# Altium PCB 20通道传感器-蓝牙主机.PcbDoc (part 2 of 2)
Units mil, origin at the board's own origin, x right, y up, seen from the top; angles counter-clockwise.
Board outline 5314.97 x 3394.43 mil, 2 copper layers (Top Layer, Bottom Layer); 93 components, 99 nets, 352 pads, 927 vias.
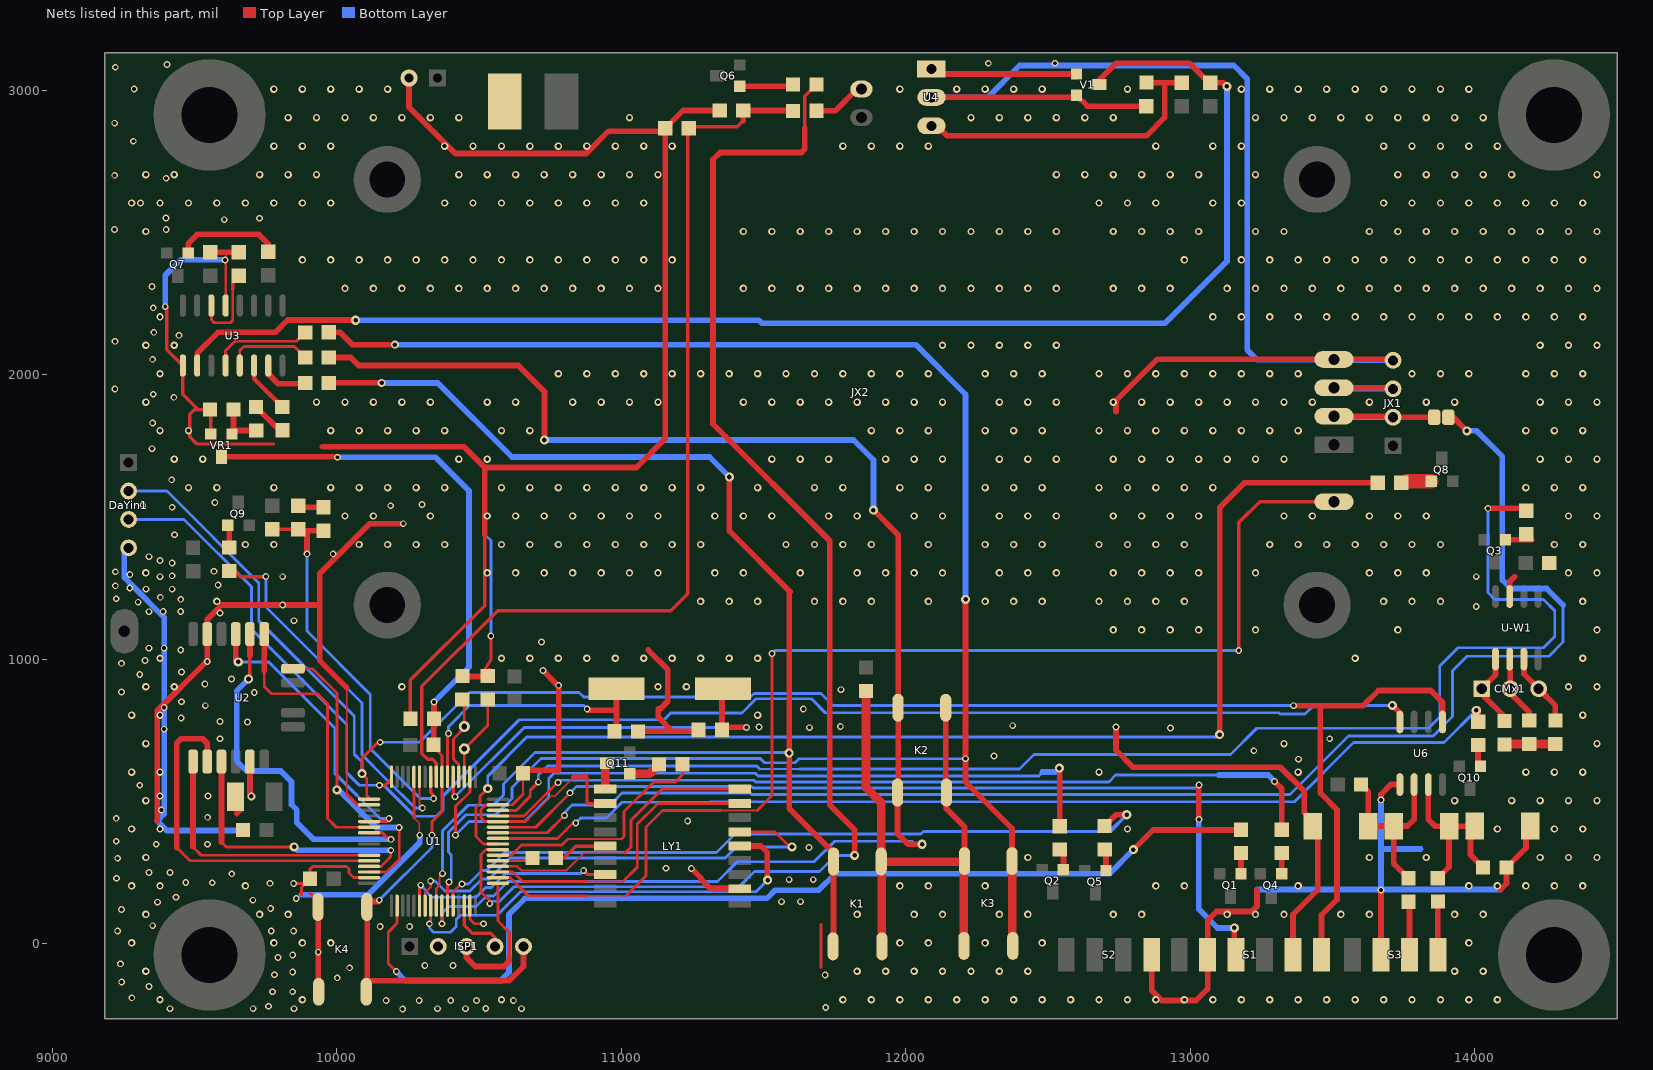
[diagram p2: the nets of this part, all layers, seen from the top]

## Via types
v1: diameter 26, hole 13.78, Top Layer to Bottom Layer, 644 vias
v2: diameter 23.62, hole 13.78, Top Layer to Bottom Layer, 242 vias
v3: diameter 32, hole 16, Top Layer to Bottom Layer, 34 vias
v4: diameter 28, hole 16, Top Layer to Bottom Layer, 7 vias

## Nets (pads, with @x,y where several pads share a name; then routed paths per layer and width w, separated by ;. In a path a pad name is that pad's centre, name@x,y a point inside that pad or via, vN(x,y) a via of type N, cw(c..) or ccw(c..) an arc to the next point about the centre after c; other vN are vias at no path point) (continued)
GND: C1.1 C2.1 C3.2 C4.1 C6.1 C7.1 C8.1 C9.1 C10.1 C11.1 C12.1 C13.2 C14.2 C15.2 CE3.2 Cm1.1 CON1.2 D2.2 D4.2 DaYin1.4 ISP1.2 JX1.4 JX2.4 K4.3 K4.4 LY1.2 LY1.11 R22.1 R23.2 R24.2 S1.2 S1.5 S2.4 S3.2 U1.12 U1.18 U1.31 U1.47 U1.60 U1.63 U2.5 U2.15 U3.1 U3.13 U4.2 U6.5 U-W1.7 V1.2 VR1.2 XZ1.2 | length 23882.8
  Top Layer w6: v2(9607.15,2402.27) v2@9609.42,2400 ; v2@9611.15,2402.23 9611.45,2429.97 ; 9648.91,447.76 9648.91,457.76 ; 10034.74,900.03 10035.44,899.33 10035.44,524.34 ; U1.12@10271.2,586.5 10271.2,549.87 U1.12@10271.99,549.87 ; 10271.99,441.84 10289.7,424.13 10289.7,383.43 v2(10291.87,381.26) ; 10654.44,525.25 C1.1@10654.44,609.5 ; 10673.15,441.14 10673.15,438.41 10752.93,518.19 10766.71,518.19 10832.83,584.32
  Top Layer w9: U3.13@9609.42,2242.77 v2@9609.42,2400
  Top Layer w10: 9508.48,1755.9 9778.48,1755.9 ; v2(9848.54,211.24) 9882.58,211.24 C2.1@9906.53,235.19 ; 9876.31,171.87 9876.31,197.67 C2.1@9906.53,227.88 C2.1@9906.53,235.19 ; 9905.28,177.88 9934.15,149.01 K4.3@9934.15,129 ; 9935.85,10.07 9935.85,71.64 ; U1.31@10113.73,232.18 10058.57,232.18 10043.04,247.72 10043.04,263.51 10034.84,271.7 9915.49,271.7 9906.98,263.19 9906.53,263.19 C2.1@9906.53,235.19 ; 10271.99,441.84 U1.12@10271.99,549.87 ; U1.47@10468.05,133.76 10468.05,85.85 10483.9,70 v2(10516.05,70) ; 10504.33,939.18 10512.88,952.42 10541.7,997.06 v2(10541.7,1081.59) ; 10654.44,525.25 10617.28,488.08 10523.61,488.08 10507.42,471.89 10507.42,442.31 10520.7,429.03 10663.76,429.03 10673.15,438.41 ; 10880,588.63 10880,494.84 10881.94,492.9 LY1.11@10943.93,492.9
  Top Layer w12: v2(9397.44,2238.8) 9403.24,2233 9403.24,2087.95 U3.1@9459.42,2031.77 9459.42,1931.12 9513.63,1876.91 ; 9508.48,1755.9 9482.87,1781.51 9482.87,1860.01 9499.77,1876.91 9513.63,1876.91 ; VR1.2@9556.96,1791.24 9556.96,1874.67 C13.2@9554.72,1876.91 9513.63,1876.91 ; 10035.44,524.34 10071.7,488.08 U1.18@10113.73,488.08 ; C12.1@10258.99,790.1 10258.98,926.53 10519.91,1187.45 10519.91,1438.03 ; 11701.84,-83.94 11701.84,66.06
  Top Layer w20: 9369.29,431.19 9369.29,818.44 v2@9539.01,988.16 ; v2@9547.54,991.53 v2(9545,991.53) U2.15@9545,1087.82 9545,1139.63 9595.37,1190 v2(9810,1190) 9940,1190 ; C3.2@9555.63,2429.97 9601.73,2429.97 ; 9611.45,2429.97 C6.1@9655.63,2429.97 ; 9648.91,457.76 CE3.2@9660.49,469.34 ; U2.5@9695,639.98 9695,525.11 9700.18,519.93 v4(9700.18,517.77) ; R22.1@9864.47,1539.02 9869.79,1533.7 C14.2@9953.43,1533.7 ; K4.3@9935.15,153.33 v2(9935.15,-30) 9935.15,-142.27 K4.4@9937.55,-144.67 ; 9950,1746.24 10447,1746.24 10519.91,1673.34 ; 10034.74,900.03 9940,994.77 9940,1190 ; v2(10234,1476) 10116,1476 9940,1300 9940,1190 ; XZ1.2@10254.08,3042.23 10254.08,2939.58 10416.66,2776.99 10876.99,2776.99 10955.61,2855.61 11144.85,2855.61 11217.34,2928.1 C15.2@11346.3,2928.1 ; C10.1@10444,939.18 10504.33,939.18 10528.37,939.18 C11.1@10530.81,940.84 10540.69,947.58 C11.1@10536.18,957.94 ; 10519.91,1438.03 10519.91,1673.34 ; C1.1@10654.44,609.5 10780,609.5 v2@10780,904.76 ; v2(10724.76,960) 10776.39,908.37 10779.31,908.37 v2(10780,907.68) ; 10832.83,584.32 10875.68,584.32 ; C7.1@11059,745.97 11180,745.97 ; 11094.34,1032.34 11163.31,963.37 11163.31,851.6 11137.34,825.62 11130,825.62 11130,795.97 11180,745.97 ; R23.2@11154.85,2855.61 11154.85,1774.85 11053.34,1673.34 10519.91,1673.34 ; v2(11246.34,264.39) 11280.52,230.22 11280.52,226.38 11314,192.9 LY1.2@11416.37,192.9 LY1.2@11416.53,192.9 ; C8.1@11271,752 11264.97,745.97 11180,745.97 ; U4.2@12090,2974.11 12592.79,2974.11 V1.2@12600,2981.32 12638,2943.32 C9.1@12845.29,2943.32 ; v2(12738.45,761.54) 12738.45,680 12798.45,620 13315.9,620 13400,535.9 13400,460.79 13447.39,413.4 13447.39,188.9 13360.75,102.26 S1.5@13360.75,-38.5 ; 12739,1870 12739,1909 12883.34,2053.34 JX2.4@13504.55,2053.34 13708.94,2053.34 JX1.4@13712.34,2049.93 ; S2.4@12864.11,-38.5 12864.11,-164.11 12900,-200 13020,-200 13060.75,-159.25 S1.2@13060.75,-38.5 13060.75,81.9 13091.75,112.9 13215.56,112.9 13234,131.34 13234,188.9 ; S3.2@13669.83,-38.5 v2(13669.83,188.9) ; v2(13669.83,505.26) 13669.83,524.68 13704.22,559.06 U6.5@13736.31,559.06 ; 14087.8,190 14090,190 14111.15,211.15 R24.2@14111.15,267.98 14179.3,336.12 D2.2@14179.3,411.4 ; U-W1.7@14122.24,1220 14122.24,1272.24 14139.89,1289.89
  Bottom Layer w10: 10519.91,1438.03 10541.7,1416.23 v2(10541.7,1081.59) ; U4.2@12069.53,2974.11 U4.2@12090,2974.11 ; 13447.39,188.9 v2(13669.83,188.9)
  Bottom Layer w20: DaYin1.4@9253.56,1384.98 9253.56,1286.44 9281.24,1258.76 9393.42,1146.58 v2(9393.42,1038.33) v2(9393.42,830) v2(9393.42,753.84) 9393.42,518.8 9393.42,455.32 9369.29,431.19 9402.87,397.62 9654.39,397.62 ; v2(9397.44,2238.8) 9397.44,2348.96 9452.41,2403.93 9605.49,2403.93 v2(9607.15,2402.27) ; 9876.31,171.87 10109.37,171.87 10291.87,354.37 v2(10291.87,381.26) ; U4.2@12090,2974.11 12288.21,2974.11 12400,3085.9 13153.01,3085.9 13200,3038.91 13200,2802.9 13200,2086.42 13234,2052.42 13503.64,2052.42 JX2.4@13504.55,2053.34 13507.96,2049.93 JX1.4@13712.34,2049.93 ; 13234,188.9 13235.1,190 v2@13670,190 ; v2(13669.83,505.26) 13670,505.09 13670,332.87 ; 13810,332.87 13670,332.87 ; 14087.8,190 v2@13670,190 ; v2@13670,190 13670,332.87
  other v1: 9379,-197.1 9879,-197.1 10579,-197.1 11779,-197.1 11879,-197.1 11979,-197.1 12079,-197.1 12179,-197.1 12279,-197.1 12379,-197.1 12479,-197.1 12579,-197.1 12679,-197.1 12779,-197.1 12879,-197.1 12979,-197.1 13079,-197.1 13179,-197.1 13279,-197.1 13379,-197.1 13479,-197.1 13579,-197.1 13679,-197.1 13779,-197.1 13879,-197.1 13979,-197.1 14079,-197.1 9329,-97.1 11829,-97.1 11929,-97.1 12029,-97.1 12129,-97.1 12229,-97.1 12329,-97.1 12429,-97.1 13929,-97.1 14029,-97.1 9279,2.9 9779,2.9 9879,2.9 9979,2.9 11979,2.9 12079,2.9 12279,2.9 12479,2.9 13979,2.9 9329,102.9 9729,102.9 9829,102.9 11829,102.9 12029,102.9 12129,102.9 12329,102.9 12429,102.9 12729,102.9 12829,102.9 13129,102.9 13229,102.9 13329,102.9 13529,102.9 13629,102.9 13929,102.9 14029,102.9 9279,202.9 9379,202.9 9679,202.9 11979,202.9 12079,202.9 12279,202.9 12879,202.9 12979,202.9 13379,202.9 13979,202.9 14079,202.9 14179,202.9 14279,202.9 14379,202.9 9329,302.9 12429,302.9 13629,302.9 13829,302.9 14229,302.9 14329,302.9 14429,302.9 9279,402.9 9379,402.9 12779,402.9 14079,402.9 14279,402.9 14379,402.9 9329,502.9 13929,502.9 14129,502.9 14229,502.9 14329,502.9 14429,502.9 9279,602.9 9379,602.9 12679,602.9 13379,602.9 14179,602.9 14279,602.9 14379,602.9 9329,702.9 13329,702.9 14429,702.9 9279,802.9 9379,802.9 11479,802.9 14379,802.9 9329,902.9 9429,902.9 10229,902.9 11129,902.9 11229,902.9 14329,902.9 14429,902.9 9379,1002.9 10579,1002.9 10679,1002.9 10779,1002.9 10879,1002.9 10979,1002.9 11079,1002.9 11179,1002.9 11279,1002.9 11379,1002.9 11479,1002.9 13579,1002.9 14379,1002.9 12729,1102.9 12829,1102.9 12929,1102.9 13029,1102.9 13229,1102.9 13729,1102.9 14429,1102.9 9579,1202.9 11279,1202.9 11379,1202.9 11479,1202.9 11679,1202.9 11779,1202.9 11879,1202.9 12079,1202.9 12279,1202.9 12379,1202.9 12479,1202.9 12679,1202.9 12779,1202.9 12879,1202.9 12979,1202.9 13679,1202.9 13779,1202.9 13879,1202.9 14379,1202.9 9329,1302.9 10529,1302.9 10629,1302.9 10729,1302.9 10829,1302.9 10929,1302.9 11029,1302.9 11129,1302.9 11329,1302.9 11429,1302.9 11629,1302.9 11829,1302.9 11929,1302.9 12029,1302.9 12129,1302.9 12329,1302.9 12429,1302.9 12529,1302.9 12729,1302.9 12829,1302.9 12929,1302.9 13029,1302.9 13229,1302.9 13629,1302.9 13729,1302.9 13829,1302.9 14329,1302.9 14429,1302.9 9679,1402.9 9779,1402.9 10079,1402.9 10179,1402.9 10279,1402.9 10379,1402.9 10579,1402.9 10679,1402.9 10779,1402.9 10879,1402.9 10979,1402.9 11079,1402.9 11179,1402.9 11279,1402.9 11579,1402.9 11679,1402.9 11779,1402.9 11879,1402.9 12079,1402.9 12279,1402.9 12379,1402.9 12479,1402.9 12679,1402.9 12779,1402.9 12879,1402.9 12979,1402.9 13279,1402.9 13379,1402.9 13479,1402.9 13579,1402.9 13679,1402.9 13779,1402.9 13879,1402.9 14279,1402.9 14379,1402.9 10029,1502.9 10129,1502.9 10329,1502.9 10529,1502.9 10629,1502.9 10729,1502.9 10829,1502.9 10929,1502.9 11029,1502.9 11129,1502.9 11329,1502.9 11429,1502.9 11529,1502.9 11729,1502.9 11829,1502.9 12029,1502.9 12129,1502.9 12329,1502.9 12429,1502.9 12529,1502.9 12729,1502.9 12829,1502.9 12929,1502.9 13029,1502.9 13329,1502.9 13429,1502.9 13629,1502.9 13729,1502.9 13829,1502.9 14329,1502.9 14429,1502.9 9479,1602.9 9579,1602.9 9779,1602.9 9979,1602.9 10079,1602.9 10179,1602.9 10279,1602.9 10379,1602.9 10579,1602.9 10679,1602.9 10779,1602.9 10879,1602.9 10979,1602.9 11079,1602.9 11179,1602.9 11279,1602.9 11479,1602.9 11679,1602.9 11779,1602.9 11979,1602.9 12079,1602.9 12279,1602.9 12379,1602.9 12479,1602.9 12679,1602.9 12779,1602.9 12879,1602.9 12979,1602.9 13079,1602.9 14179,1602.9 14279,1602.9 14379,1602.9 9429,1702.9 9529,1702.9 10429,1702.9 10529,1702.9 11529,1702.9 11629,1702.9 11729,1702.9 11929,1702.9 12029,1702.9 12129,1702.9 12329,1702.9 12429,1702.9 12529,1702.9 12729,1702.9 12829,1702.9 12929,1702.9 13029,1702.9 13129,1702.9 13229,1702.9 13329,1702.9 14229,1702.9 14329,1702.9 14429,1702.9 9379,1802.9 9479,1802.9 9979,1802.9 10079,1802.9 10179,1802.9 10279,1802.9 10379,1802.9 10579,1802.9 10679,1802.9 11879,1802.9 11979,1802.9 12079,1802.9 12279,1802.9 12379,1802.9 12479,1802.9 12679,1802.9 12779,1802.9 12879,1802.9 12979,1802.9 13079,1802.9 13179,1802.9 13279,1802.9 13379,1802.9 14179,1802.9 14279,1802.9 14379,1802.9 9329,1902.9 9929,1902.9 10029,1902.9 10129,1902.9 10229,1902.9 10329,1902.9 10529,1902.9 10629,1902.9 10829,1902.9 10929,1902.9 11029,1902.9 11129,1902.9 11429,1902.9 11529,1902.9 11629,1902.9 11729,1902.9 11829,1902.9 11929,1902.9 12029,1902.9 12129,1902.9 12329,1902.9 12429,1902.9 12529,1902.9 12729,1902.9 12829,1902.9 12929,1902.9 13029,1902.9 13129,1902.9 13229,1902.9 13329,1902.9 13429,1902.9 13629,1902.9 13829,1902.9 13929,1902.9 14229,1902.9 14329,1902.9 14429,1902.9 9379,2002.9 10779,2002.9 10879,2002.9 10979,2002.9 11079,2002.9 11179,2002.9 11279,2002.9 11379,2002.9 11479,2002.9 11579,2002.9 11679,2002.9 11779,2002.9 11879,2002.9 11979,2002.9 12079,2002.9 12279,2002.9 12379,2002.9 12479,2002.9 12679,2002.9 12779,2002.9 12879,2002.9 12979,2002.9 13079,2002.9 13179,2002.9 13279,2002.9 13379,2002.9 13779,2002.9 13879,2002.9 13979,2002.9 14179,2002.9 14279,2002.9 14379,2002.9 9329,2102.9 9429,2102.9 12129,2102.9 12229,2102.9 12329,2102.9 12429,2102.9 12529,2102.9 14229,2102.9 14329,2102.9 14429,2102.9 9379,2202.9 13079,2202.9 13179,2202.9 13279,2202.9 13379,2202.9 13479,2202.9 13579,2202.9 13679,2202.9 13779,2202.9 13879,2202.9 13979,2202.9 14079,2202.9 14179,2202.9 14279,2202.9 14379,2202.9 10029,2302.9 10129,2302.9 10229,2302.9 10329,2302.9 10429,2302.9 10529,2302.9 10629,2302.9 10729,2302.9 10829,2302.9 10929,2302.9 11029,2302.9 11129,2302.9 11429,2302.9 11529,2302.9 11629,2302.9 11729,2302.9 11829,2302.9 11929,2302.9 12029,2302.9 12129,2302.9 12229,2302.9 12329,2302.9 12429,2302.9 12529,2302.9 12729,2302.9 12829,2302.9 12929,2302.9 13129,2302.9 13229,2302.9 13329,2302.9 13429,2302.9 13529,2302.9 13629,2302.9 13729,2302.9 13829,2302.9 13929,2302.9 14029,2302.9 14129,2302.9 14229,2302.9 14329,2302.9 14429,2302.9 9879,2402.9 9979,2402.9 10079,2402.9 10179,2402.9 10279,2402.9 10379,2402.9 10479,2402.9 10579,2402.9 10679,2402.9 10779,2402.9 10879,2402.9 10979,2402.9 11079,2402.9 11179,2402.9 12979,2402.9 13179,2402.9 13279,2402.9 13379,2402.9 13479,2402.9 13579,2402.9 13679,2402.9 13779,2402.9 13879,2402.9 13979,2402.9 14079,2402.9 14179,2402.9 14279,2402.9 14379,2402.9 9329,2502.9 11429,2502.9 11529,2502.9 11629,2502.9 11729,2502.9 11829,2502.9 11929,2502.9 12029,2502.9 12129,2502.9 12229,2502.9 12329,2502.9 12429,2502.9 12529,2502.9 12729,2502.9 12829,2502.9 12929,2502.9 13029,2502.9 13229,2502.9 13329,2502.9 13629,2502.9 13729,2502.9 13829,2502.9 13929,2502.9 14029,2502.9 14129,2502.9 14229,2502.9 14329,2502.9 14429,2502.9 9279,2602.9 9379,2602.9 9479,2602.9 9579,2602.9 9679,2602.9 9779,2602.9 9879,2602.9 9979,2602.9 10379,2602.9 10479,2602.9 10579,2602.9 10679,2602.9 10779,2602.9 10879,2602.9 10979,2602.9 11079,2602.9 12679,2602.9 12779,2602.9 12879,2602.9 13079,2602.9 13179,2602.9 13679,2602.9 13779,2602.9 13879,2602.9 13979,2602.9 14079,2602.9 14179,2602.9 14279,2602.9 14379,2602.9 9329,2702.9 9429,2702.9 9729,2702.9 9829,2702.9 9929,2702.9 10429,2702.9 10529,2702.9 10629,2702.9 10729,2702.9 10829,2702.9 10929,2702.9 11029,2702.9 11129,2702.9 12529,2702.9 12629,2702.9 12729,2702.9 12829,2702.9 12929,2702.9 13029,2702.9 13229,2702.9 13729,2702.9 13829,2702.9 13929,2702.9 14029,2702.9 14129,2702.9 14429,2702.9 9779,2802.9 9879,2802.9 9979,2802.9 10379,2802.9 10479,2802.9 10579,2802.9 10679,2802.9 10779,2802.9 10879,2802.9 10979,2802.9 11079,2802.9 11179,2802.9 11779,2802.9 11879,2802.9 11979,2802.9 12079,2802.9 12879,2802.9 13079,2802.9 13179,2802.9 13679,2802.9 13779,2802.9 13879,2802.9 13979,2802.9 14079,2802.9 9829,2902.9 9929,2902.9 10029,2902.9 10129,2902.9 10229,2902.9 10329,2902.9 10429,2902.9 11029,2902.9 12229,2902.9 12329,2902.9 12429,2902.9 12529,2902.9 12629,2902.9 12729,2902.9 13229,2902.9 13329,2902.9 13429,2902.9 13529,2902.9 13629,2902.9 13729,2902.9 13829,2902.9 13929,2902.9 14029,2902.9 9779,3002.9 9879,3002.9 9979,3002.9 10079,3002.9 10179,3002.9 11979,3002.9 12179,3002.9 12279,3002.9 12379,3002.9 12479,3002.9 12779,3002.9 13179,3002.9 13279,3002.9 13379,3002.9 13479,3002.9 13579,3002.9 13679,3002.9 13779,3002.9 13879,3002.9 13979,3002.9
  other v2: 10231.83,-230 9414.4,-228.38 9706.19,-228.38 9850,-228.38 10354.51,-228.38 10452.54,-228.38 10523.61,-228.08 10649.32,-228.38 11718.68,-224.13 9760,-220 10173.54,-200.11 10289.61,-200.11 10400.59,-200.11 10490.98,-200.11 10620.64,-200 9280,-190.44 9774.37,-169 9845,-169 9340,-150.58 9244.29,-134.68 10001.88,-120 11716.54,-110 9780.93,-109.17 9845,-100 10045.57,-84.85 10309.69,-77.1 10408.96,-77.1 9240,-71.08 9793.91,-48.89 9845,-40.26 9230,44.68 9770,44.68 9848.54,44.68 10152.56,60 10256.36,60 9352.96,63.2 9243.56,120 9767.66,123.73 9370,145.73 11562.92,147.45 11630,147.45 9705,152.83 9857.65,158.53 9435.1,163.09 9765.63,212.12 9562.47,213.93 9469.51,214.57 11590,224.9 11674.76,224.9 9225.72,229.75 9630.93,245.18 9340,250 9414.4,250 11157.33,264.99 9230,300 11660,338.03 9365.7,349.46 9545.62,349.46 9225.22,360 11233.24,430.91 9225.22,440.28 9546.24,443.9 9383.51,470 9379,518.8 9547.23,518.64 9307.82,556.73 13380,648.2 12310,659.61 13223.1,677.9 9590,720.04 13489.71,720.04 12930,758.06 11661.82,759.18 11484.21,761.54 11770,763.48 12375.57,766.08 9686.63,779.06 9590,780.88 9453.12,792.91 11640,824.9 9538.31,836.45 9454.35,850 9710,882.84 9243.56,884.51 11772,892.61 9536.63,912.68 9630,930 9307.82,945.86 9454.35,954.54 9243.56,984.99 9326.18,994.77 9451.87,1032.34 9340.45,1038.33 10720,1060 9850,1135.26 9590,1161.65 9340,1166.65 9390.08,1166.97 9451.74,1166.97 14004.73,1184.95 9302.2,1200 9451.87,1210 9225.22,1212.25 9380,1217.22 9330,1245.87 9421.64,1245.87 9272.48,1250 9221.81,1257.58 9583.46,1260.05 9379,1289.89 9810,1289.89 14004.73,1289.89 9421.64,1292.62 9272.84,1297 9221.81,1307 9568.48,1308.5 9421.64,1337.55 9379,1346.58 9340,1360.15 9987.5,1370 9430,1436.96 9421.64,1533.7 10189.57,1539.02 9318.6,1540.8 10300,1543.7 9571.52,1550 9419.93,1630 9351.16,1739.62 9352.96,1830 9427.51,1920 9355.13,1930.91 9220.35,1949.42 9352.96,2053.34 9221.03,2116.85 9445.28,2137.89 9357.37,2148.45 9355.13,2234.42 9351.16,2309.5 9218.95,2510 9400.63,2510 9604.67,2544.34 9728.42,2549.3 9400,2550 9310.58,2603.17 9400.63,2690 9219.6,2700 9285.1,2820 9219.65,2883.58 9288.18,3003.3 9221.81,3080 9403.28,3090 12290,3094.11 12524.11,3094.11
K-1: Cm2.2 CMx1.1 U-W1.1 | length 270.6
  Top Layer w20: U-W1.1@14072.24,1000 14072.24,944.01 CMx1.1@14024.15,895.92 14024.15,877.38 14103.68,797.85 Cm2.2@14103.68,782.25
K-2: Cm3.2 CMx1.2 U-W1.2 | length 244.1
  Top Layer w6: U-W1.2@14122.24,1000 14122.24,980 U-W1.2@14124.15,978.09
  Top Layer w12: CMx1.2@14124.15,881.25 CMx1.2@14124.15,895.92
  Top Layer w20: CMx1.2@14124.15,881.25 14190.82,814.58 Cm3.2@14190.82,784.3 ; CMx1.2@14124.15,895.92 U-W1.2@14124.15,978.09
K-3: Cm4.2 CMx1.3 U-W1.3 | length 269
  Top Layer w6: Cm4.2@14285.99,779.97 Cm4.2@14289.18,783.16
  Top Layer w20: U-W1.3@14172.24,1000 14172.24,947.83 CMx1.3@14224.15,895.92 14282.83,837.24 Cm4.2@14282.83,784.02 ; Cm4.2@14293.99,778.35 Cm4.2@14295.89,780.25
KEY1: K1.1 K1.2 R5.2 U1.41 | length 4956.2
  Top Layer w8: U1.41@10349.94,133.76 10349.94,193.98 10361.37,205.41 10361.37,235.08 v2(10372.08,245.8)
  Top Layer w20: R5.2@9971.63,1970.71 10157.38,1970.71 v4(10157.58,1970.51) ; v3(11380,1640) 11380,1450 11593.51,1236.49 11590,1232.98 v3(11590,670) 11590,475.66 11746.15,319.51 K1.1@11746.15,288.59 K1.2@11746.15,11.03
  Bottom Layer w6: v3@11588.19,671.81 v3(11590,670)
  Bottom Layer w10: v2(10372.08,245.8) 10372.08,396.56 10462.08,486.56 10549.94,486.56 10585.7,522.31 10585.7,561 10696.51,671.81 v3@11588.19,671.81
  Bottom Layer w20: v4(10157.58,1970.51) 10355.22,1970.51 10615.72,1710 11310,1710 v3(11380,1640)
KEY2: K2.1 K2.2 R3.2 U1.42 | length 5512.4
  Top Layer w6: U1.42@10369.63,133.76 U1.42@10370,133.38
  Top Layer w10: v2(10370,70) U1.42@10370,133.38
  Top Layer w20: R3.2@9971.98,2060.2 10049.11,2060.2 10077.54,2031.77 10213.41,2031.77 10637.87,2031.77 10730,1939.64 v3(10730,1770) ; v3(11886.15,1523.85) 11973.01,1436.99 K2.1@11973.01,829 11973.01,533 K2.2@11971.01,531 11971.01,386.3 12007.93,349.37 v3(12057.19,349.37)
  Bottom Layer w10: v2(10370,70) 10370,106.37 10369.63,106.74 10392.98,130.09 10489.53,130.09 10526.6,167.17 10550.77,167.17 10601.75,218.15 11338.15,218.15 11407.78,287.78 11677.78,287.78 11750,360 12021.19,360 12031.81,349.37 v3(12057.19,349.37)
  Bottom Layer w20: v3(10730,1770) 11816.15,1770 11886.15,1700 v3(11886.15,1523.85)
KEY3: K3.3 K3.4 R2.2 U1.43 | length 6561.8
  Top Layer w6: v2@10389.31,211.51 v2@10394.09,216.29 ; K3.3@12373.49,-5.42 K3.3@12375.89,-7.82
  Top Layer w10: U1.43@10389.31,133.76 v2@10389.31,211.51
  Top Layer w20: R2.2@9971.63,2148.45 10011.23,2148.45 10054.47,2105.2 v4(10204.15,2105.2) ; v3(12210,1210) v2(12210,650) 12210,568.58 12373.49,405.09 K3.4@12373.49,290.18
  Top Layer w30: K3.3@12373.49,-5.42 K3.4@12373.49,290.18
  Bottom Layer w6: v2(10394.76,216.97) v2@10402.69,224.89
  Bottom Layer w10: v2@10402.69,224.89 10402.69,312.07 10392.52,322.25 10392.52,391.54 10453.93,452.95 10559.1,452.95 10616.15,510 10616.15,549.35 10717.6,650.81 11488.15,650.81 11502.96,636 11610.91,636 11624.91,650 v2(12210,650)
  Bottom Layer w20: v4(10204.15,2105.2) 12034.8,2105.2 12210,1930 v3(12210,1210)
KEY-RST: R4.2 RS1.1 | length 126.4
  Top Layer w20: RS1.1@9716.58,1886.05 9798.53,1804.1 R4.2@9809.03,1804.1
lanya_3V3: LY1.10 Q11.3 | length 93.9
  Top Layer w6: Q11.3@10943.93,628.19 Q11.3@10950,634.26
  Top Layer w30: LY1.10@10943.93,542.9 Q11.3@10943.93,628.19
Lanya_kz: R20.1 U1.54 | length 853
  Top Layer w6: 10812.22,367.9 11001,367.9
  Top Layer w10: U1.54@10566.47,310.92 10613.91,310.92 10649.45,346.46 10790.79,346.46 10812.22,367.9 ; 11001,367.9 11010,376.9 11010,464.4 11114.09,568.49 11189.42,568.49 11214.71,593.77 R20.1@11214.71,630.1
LCD_BUSY: JX2.5 U1.50 | length 4194.4
  Top Layer w6: 10879.82,168.15 11016.95,168.15 ; 11348.86,468.15 11477.98,468.15
  Top Layer w10: U1.50@10566.47,232.18 10609.32,232.18 10673.35,168.15 10879.82,168.15 ; 11016.95,168.15 11087.14,238.35 11087.14,410 11145.29,468.15 11348.86,468.15 ; 11477.98,468.15 11530,520.17 v2(11530,1020)
  Top Layer w12: v2(13170,1030) 13170,1480 13243.34,1553.34 JX2.5@13504.55,1553.34
  Bottom Layer w10: v2(11530,1020) 11530.95,1020 11540.95,1030 v2@13169.05,1030
LPUART_RX: LY1.9 U1.52 | length 1029.5
  Top Layer w6: 10867.9,317.9 11011.9,317.9
  Top Layer w8: U1.52@10566.47,271.55 10634.8,271.55 10649.61,256.74 10806.74,256.74 10867.9,317.9
  Top Layer w10: 11011.9,317.9 11034,340 11034,433.75 11143.15,542.9 LY1.9@11416.37,542.9
LPUART_TX: LY1.8 U1.51 | length 1066.5
  Top Layer w6: 10877.88,218.15 11005.6,218.15 ; LY1.8@11416.37,492.9 LY1.8@11416.53,492.9
  Top Layer w10: U1.51@10566.47,251.86 10620,251.86 10653.71,218.15 10877.88,218.15 ; 11005.6,218.15 11056.05,268.6 11056.05,420 11128.95,492.9 LY1.8@11416.37,492.9
MISO: U1.22 U2.11 | length 993.5
  Top Layer w10: 9745,960 9745,904.15 9770.75,878.4 9932.52,878.4 9967.74,843.17 9967.74,439.98 9998.39,409.34 U1.22@10113.73,409.34
  Top Layer w20: 9745,960 U2.11@9745,1087.82
MOSI: U1.23 U2.12 | length 1281.8
  Top Layer w6: v2@10182.6,366.74 v2(10190.7,366.74)
  Top Layer w8: v3(9690,930) v3@9695,935
  Top Layer w12: v3@9695,935 9695,1011.41 ; U1.23@10113.73,389.66 10159.68,389.66 v2@10182.6,366.74
  Top Layer w20: 9695,1011.41 U2.12@9695,1087.82
  Bottom Layer w20: v3(9690,930) 9648.19,888.19 9648.19,641.81 9683.26,606.74 9803.33,606.74 9841.34,568.73 9841.34,488.66 9860,470 9860,424.68 9917.94,366.74 v2(10190.7,366.74)
MX_BRTS: LY1.16 U1.38 | length 786.6
  Top Layer w10: U1.38@10290.89,133.76 10290.89,197.4 10295.22,201.73 v2(10295.22,205.41)
  Top Layer w12: v2(10867.95,256.9) 10881.95,242.9 LY1.16@10943.93,242.9
  Bottom Layer w8: 10857.79,246.74 v2(10867.95,256.9)
  Bottom Layer w10: v2(10295.22,205.41) 10315.72,184.91 10315.72,180.99 10333.61,163.09 10489.59,163.09 10523.61,197.12 10543.61,197.12 10593.23,246.74 10857.79,246.74
MX_CDS: LY1.5 U1.40 | length 1570.4
  Top Layer w10: v2(10325.52,70) 10330.26,74.74 U1.40@10330.26,133.76
  Top Layer w20: LY1.5@11416.37,342.9 11491.06,342.9 11513.34,320.62 11513.34,223.99 v3(11514.31,223.02)
  Bottom Layer w10: v2(10325.52,70) 10325.52,54.48 10340,40 10400,40 10420,60 10420,84.51 10435.49,100 10563.39,100 10645.54,182.15 11473.44,182.15 v3(11514.31,223.02)
MX_LINK: LY1.6 U1.39 | length 1648.7
  Top Layer w8: U1.39@10310.57,133.76 10310.57,179.7 10330,199.13 v2(10330,220.23) ; v3@11593.51,340 v3(11600,340)
  Top Layer w10: LY1.6@11416.37,392.9 11540.62,392.9 v3@11593.51,340
  Bottom Layer w10: v2(10330,220.23) 10345.19,220.23 10380.22,185.19 10467.65,185.19 10510,227.54 10536.08,227.54 10610,301.46 11365.59,301.46 11404.12,340 v3(11600,340)
MX_RST: R28.2 U1.53 | length 138.1
  Top Layer w6: R28.2@10677.66,291.23 R28.2@10687.7,301.26 ; R28.2@10679.87,310.92 R28.2@10688.85,319.9
  Top Layer w10: U1.53@10566.47,291.23 R28.2@10677.66,291.23
NetC6_2: C6.2 U3.14 | length 277.3
  Top Layer w10: U3.14@9559.42,2242.77 9559.42,2192.16 9569.39,2182.19 9625.63,2182.19 9634.42,2190.98 9634.42,2300
  Top Layer w12: 9634.42,2300 9634.42,2320 C6.2@9644.97,2330.56
NetC9_2: C9.2 R7.2 U4.3 | length 1232.7
  Top Layer w6: C9.2@12845.39,3026.02 12909.5,3026.02 12919,3026.02 12919.4,3025.62 R7.2@12969.8,3025.62
  Top Layer w20: U4.3@12090,2874.11 12110.47,2874.11 12145.68,2838.9 12845.29,2838.9 12909.5,2903.11 12909.5,3026.02 ; C9.2@12845.39,3026.02 12909.5,3026.02 ; R7.2@12969.8,3025.62 12969.4,3026.02 12919,3026.02 12909.5,3026.02
NetC13_1: C13.1 RS1.2 VR1.1 | length 152.4
  Top Layer w20: C13.1@9637.42,1876.81 9637.42,1803.75 RS1.2@9716.78,1803.75
NetCm2_1: Cm2.1 Cm3.1 Cm4.1 | length 196.2
  Top Layer w6: Cm4.1@14281.56,701.6 Cm4.1@14285.89,697.27
  Top Layer w20: Cm2.1@14099.89,701.6 Cm2.1@14105.83,695.65
  Top Layer w30: Cm2.1@14099.88,701.6 Cm4.1@14281.56,701.6
NetD2_1: D2.1 D3.1 R24.1 R25.1 U6.7 | length 650.1
  Top Layer w6: D3.1@13909.19,399.1 D3.1@13909.2,412.4 ; R24.1@14034.73,273.66 R24.1@14040.71,267.68
  Top Layer w20: U6.7@13836.31,559.06 13836.31,436.65 13860.57,412.4 D3.1@13909.2,412.4 13983.41,412.4 13984.41,411.4 13984.41,312.22 R24.1@14028.85,267.78 ; R25.1@13869.73,230.11 13909.19,269.57 D3.1@13909.19,399.1
NetD3_2: D3.2 D4.1 R26.1 R27.2 U6.6 | length 692.3
  Top Layer w6: D3.2@13714.31,412.4 13761.84,412.4 13762.85,413.4
  Top Layer w20: R27.2@13600.04,559.16 13625.02,534.19 13625.02,430.65 13642.27,413.4 13762.85,413.4 13786.31,436.87 U6.6@13786.31,559.06 ; D3.2@13714.31,412.4 13714.31,281.65 R26.1@13766.21,229.76
NetGZ1_1: GZ1.1 R21.1 | length 189.7
  Top Layer w6: GZ1.1@11828.73,3003.3 GZ1.1@11843.86,3003.3
  Top Layer w20: R21.1@11685.82,2926.77 11752.2,2926.77 GZ1.1@11828.73,3003.3
NetJX1_2: JX1.2 JX2.2 RJX1.2 | length 547.9
  Top Layer w20: JX2.2@13504.55,1853.34 13726.4,1853.34 13730,1849.74 RJX1.2@13841.78,1849.74
  Bottom Layer w20: JX2.2@13504.55,1853.34 13507.96,1849.93 JX1.2@13712.34,1849.93
NetJX1_3: JX1.3 JX2.3 | length 418.4
  Top Layer w20: JX2.3@13504.55,1953.34 13708.94,1953.34 JX1.3@13712.34,1949.93
  Bottom Layer w20: JX2.3@13504.55,1953.34 13507.96,1949.93 JX1.3@13712.34,1949.93
NetK1_3: K1.3 K1.4 K2.3 K2.4 K3.1 K3.2 R6.1 | length 2073.6
  Top Layer w20: K2.4@12140.31,829 12140.31,533.4 K2.3@12142.71,531 12142.71,474.06 12206.19,410.58 K3.1@12206.19,290.18 12204.6,288.59 K3.1@12203.78,288.59
  Top Layer w30: R6.1@11860.06,888.37 11860.06,548.78 11913.45,495.39 K1.4@11913.45,288.59 12203.78,288.59 12204.19,288.18 K3.2@12204.19,-7.82 ; K1.3@11915.85,-9.41 K1.4@11915.85,286.19
NetLY1_14: LY1.14 R28.1 | length 191.7
  Top Layer w12: R28.1@10770,301.46 10798,301.46 10798.53,300.93 10840.5,342.9 LY1.14@10943.93,342.9 LY1.14@10944.09,342.9
NetQ1_1: Q1.1 R9.2 | length 73.1
  Top Layer w20: Q1.1@13177.89,245.18 13178.1,245.39 R9.2@13178.1,318.23
NetQ2_1: Q2.1 R8.2 | length 75.2
  Top Layer w20: R8.2@12541.07,330.53 12553.9,317.7 Q2.1@12553.9,260.67
NetQ3_1: Q3.1 R10.2 | length 105.5
  Top Layer w8: R10.2@14200,1420 14200,1438.85 R10.2@14200.1,1438.85
  Top Layer w20: Q3.1@14113.46,1420 R10.2@14200,1420
NetQ4_1: Q4.1 R12.2 | length 73.1
  Top Layer w20: Q4.1@13321.17,245.18 13321.27,245.28 R12.2@13321.27,318.23
NetQ5_1: Q5.1 R13.2 | length 75.9
  Top Layer w20: R13.2@12698.87,330.87 12703.43,326.31 Q5.1@12703.43,256.9
NetQ6_1: Q6.1 R14.2 | length 189.9
  Top Layer w20: Q6.1@11416.53,3012.75 11597.6,3012.75 R14.2@11603.87,3019.02
NetQ7_1: Q7.1 R15.2 | length 369.6
  Top Layer w20: Q7.1@9478.24,2427.27 9478.24,2460.63 9510.47,2492.86 9725.62,2492.86 9759.22,2459.27 ; R15.2@9759.22,2431.6 9759.22,2459.27 ; 9759.22,2459.6 9759.22,2459.27
NetQ8_1: Q8.1 R16.2 | length 113.2
  Top Layer w6: R16.2@13741.15,1620.1 R16.2@13753.05,1632
  Top Layer w20: R16.2@13753.05,1632 R16.2@13760.15,1624.9
  Top Layer w50: R16.2@13760.15,1624.9 Q8.1@13846.52,1624.9
NetQ9_1: Q9.1 R18.2 | length 85.8
  Top Layer w20: Q9.1@9616.89,1470.36 9622.5,1464.75 9622.5,1400.26 R18.2@9631.96,1390.8
NetQ10_1: Q10.1 R17.2 | length 68.8
  Top Layer w20: Q10.1@14011.14,629.06 14011.14,697.24 R17.2@14011.58,697.68
NetQ11_1: Q11.1 R20.2 | length 115.9
  Top Layer w30: Q11.1@11030,597.26 11099.77,597.26 R20.2@11132.41,629.9
NetR1_2: R1.2 U3.2 V1.3 | length 4942.3
  Top Layer w20: U3.2@9509.42,2031.77 9509.42,2074.67 9582.99,2148.25 9784.2,2148.25 9827.4,2191.45 10065.52,2191.45 v3(10066.19,2190.77) ; V1.3@12680,3019.32 12680,3035.11 12739,3094.11 12996.79,3094.11 13065.28,3025.62 R1.2@13069.8,3025.62 13115.62,3025.62 v3(13128.5,3012.75)
  Bottom Layer w20: v3(10066.19,2190.77) 11484.33,2190.77 11495.1,2180 12910,2180 13128.5,2398.5 v3(13128.5,3012.75)
NetR2_1: R2.1 U3.4 | length 358.4
  Top Layer w10: U3.4@9609.42,2031.77 9609.42,2083.48 9642.78,2116.85 9857.93,2116.85 R2.1@9889.33,2148.25
NetR3_1: R3.1 U3.5 | length 305.1
  Top Layer w10: U3.5@9659.42,2031.77 9659.42,2084.61 9673.66,2098.85 9850.83,2098.85 R3.1@9889.68,2060
NetR4_1: R4.1 U3.6 | length 186.6
  Top Layer w16: U3.6@9709.42,2031.77 9709.42,1985.82 R4.1@9808.83,1886.4
NetR5_1: R5.1 U3.7 | length 175
  Top Layer w20: U3.7@9759.42,2031.77 9759.42,2002.56 9794.58,1967.4 9886.22,1967.4 R5.1@9889.33,1970.51
NetU4_1: U4.1 V1.1 | length 517.4
  Top Layer w6: U4.1@12090,3074.11 U4.1@12100,3064.11
  Top Layer w20: U4.1@12100,3064.11 12107.79,3056.31 V1.1@12600,3056.32
NRST: C12.2 ISP1.5 K4.1 K4.2 R11.2 U1.7 VR1.3 | length 3459.5
  Top Layer w6: 10369.63,661.34 10369.63,664.16
  Top Layer w8: R11.2@10340.73,690.24 10369.63,661.34
  Top Layer w10: v2(10334.74,381.26) 10334.74,428.37 10369.63,463.26 U1.7@10369.63,586.5 10369.63,661.34
  Top Layer w20: VR1.3@9594.96,1711.24 9999.78,1711.24 10001.59,1709.43 v2(10002.57,1709.43) ; K4.1@10104.85,-144.67 10119.52,-130 10606.36,-130 10656.36,-80 ISP1.5@10656.36,-10 ; K4.2@10105.85,129 K4.2@10106.85,130 ; K4.1@10106.85,-130 K4.2@10106.85,130 ; v2(10149.53,152.83) 10144.64,147.94 10124.79,147.94 K4.2@10106.85,130 ; R11.2@10340.55,693.64 R11.2@10340.55,698.78 ; R11.2@10341.15,713.15 10341.15,780.35 10341.68,780.88 C12.2@10341.69,790 v2(10341.68,849.04)
  Bottom Layer w10: v2(10149.53,152.83) 10334.7,338.01 10334.7,381.23 v2(10334.74,381.26)
  Bottom Layer w20: v2(10002.57,1709.43) 10346.89,1709.43 10464.92,1591.4 10464.92,972.28 v2(10341.68,849.04)
PA11: R13.1 U1.44 | length 2622
  Top Layer w6: v2@10437.2,210 v2(10440,210)
  Top Layer w10: U1.44@10409,133.76 10409,181.8 v2@10437.2,210
  Top Layer w20: R13.1@12698.67,413.17 12738.45,452.95 v3(12776.42,452.95)
  Bottom Layer w10: v2(10440,210) 10462.75,210 10510,257.25 10527.25,257.25 10590,320 11334.26,320 11399.35,385.09 12052.66,385.09 12061.75,394.17 12717.64,394.17
  Bottom Layer w12: 12717.64,394.17 v3(12776.42,452.95)
PB1: U1.27 U2.1 | length 930.8
  Top Layer w10: 9495,340 9524.08,310.92 U1.27@10113.73,310.92
  Top Layer w20: 9495,340 U2.1@9495,639.98
PB2: U1.28 U2.2@9545,639.98 | length 1246.1
  Top Layer w10: 9437.95,337.95 9484.67,291.23 U1.28@10113.73,291.23
  Top Layer w20: 9437.95,337.95 9437.95,704.83 9453.12,720 9529.24,720 9545,704.24 U2.2@9545,639.98
PB3: R14.1 U1.55 | length 4837.4
  Top Layer w6: v2(10537.71,140.36) v2@10537.71,151.72
  Top Layer w10: v2@10537.71,151.72 10507.42,182.01 10507.42,313.36 10524.66,330.6 U1.55@10566.47,330.6
  Top Layer w12: 11644.82,2866.7 11644.82,2977.87 R14.1@11686.17,3019.22
  Top Layer w20: 11644.82,2866.7 11644.82,2792.43 11633.1,2780.71 11347.72,2780.71 11322.53,2755.52 11322.53,1826.5 11732.85,1416.18 11732.85,487.15 11820,400 v3(11820,310)
  Bottom Layer w10: v2(10537.71,140.36) 10546.52,149.17 10571.63,149.17 10622.61,200.15 11414.81,200.15 11468.66,254 11696.58,254 11752.58,310 v3(11820,310)
PB4: R16.1 U1.56 | length 4339.2
  Top Layer w10: v3(10530.7,545.09) 10503.74,518.13 10503.74,494.42 10490,480.68 10490,376.34 10516.05,350.29 U1.56@10566.47,350.29
  Top Layer w20: v3(13103,734.9) 13103,1533 13189.9,1619.9 R16.1@13658.85,1619.9
  Bottom Layer w6: v3@13093.81,725.71 v3(13103,734.9)
  Bottom Layer w10: v3(10530.7,545.09) 10530.7,588.55 10667.86,725.71 v3@13093.81,725.71
PB5: R17.1 U1.57 | length 3677.8
  Top Layer w10: U1.57@10566.47,369.97 10775.84,369.97 10830,424.13 v2(10840,424.13)
  Top Layer w20: v3(14004.73,820) 14006.83,820 14011.38,824.55 R17.1@14011.38,779.98
  Bottom Layer w10: v2(10840,424.13) 10857.71,441.84 10948.06,441.84 11003.04,496.81 11311.46,496.81 11313.36,498.71 13365.52,498.71 13573.18,706.38 13891.11,706.38 v3(14004.73,820)
PB8: R12.1 U1.61 | length 2989.5
  Top Layer w10: U1.61@10566.47,448.71 10657.99,448.71 10775.72,566.44 v2(10777.8,566.44)
  Top Layer w20: v2(13296.06,570) 13321.07,544.99 R12.1@13321.07,400.53
  Bottom Layer w6: v2@10770,570 v2@10774.38,574.38
  Bottom Layer w10: v2@10774.38,574.38 11465.59,574.38 11471.59,568.38 12713.48,568.38 12737.48,592.38 13100,592.38
  Bottom Layer w20: 13100,592.38 13273.68,592.38 v2(13296.06,570)
PB9: R10.1 U1.62 | length 4914.8
  Top Layer w8: R10.1@14156.98,1530 14165.84,1521.15 14180.37,1521.15 R10.1@14199.8,1521.15
  Top Layer w10: U1.62@10566.47,468.4 10630.63,468.4 10680,517.77 10680,538.88 10708.48,567.36 v2(10708.48,567.61)
  Top Layer w20: v2(14045.59,1530) R10.1@14156.98,1530
  Bottom Layer w8: 11486.78,614 11493.85,614 11627.1,614
  Bottom Layer w10: v2(10708.48,567.61) 10708.48,592.93 10740.4,624.86 11475.92,624.86 11486.78,614 ; 11627.1,614 12399.14,614 12450.04,664.9 13141.21,664.9 13233.32,757.01 13836.74,757.01 13876.24,796.51 13876.24,976.24 13940,1040 14240.78,1040 14280.78,1080 14280.78,1170 14240.78,1210 14069.64,1210 14045.59,1234.05 v2(14045.59,1530)
PB10: U1.29 U2.3 | length 1051.6
  Top Layer w10: 9595,356.82 9611.82,340 9840,340 9850,330 v3(9850,340) ; U2.3@9595,639.98 U2.3@9603.37,606.52 ; U1.29@10113.73,271.55 10155.7,271.55 10179.7,295.55 10179.7,295.68 10190,305.98 v2(10190,328.35)
  Top Layer w20: 9595,356.82 U2.3@9595,639.98
  Bottom Layer w20: v3(9850,340) 9861.65,328.35 v2(10190,328.35)
PB13: R9.1 U1.34 | length 3576.7
  Top Layer w10: v2(10209.36,-98.13) 10180.84,-69.6 10180.84,40.33 10212.15,71.64 U1.34@10212.15,133.76 ; R9.1@13176.47,399.1 R9.1@13177.9,400.53
  Top Layer w20: v3(12800,330.53) 12868.57,399.1 R9.1@13176.47,399.1
  Bottom Layer w20: v2(10209.36,-98.13) 10240.44,-129.2 10576.37,-129.2 10605.57,-100 10605.57,103.43 10661.29,159.15 11512.38,159.15 11541.35,188.12 11693.77,188.12 11750.82,245.18 12714.65,245.18 v3(12800,330.53)
PC0: C15.1 R21.2 R23.1 U1.8 | length 3466.2
  Top Layer w8: C15.1@11429,2928 C15.1@11449,2928
  Top Layer w12: U1.8@10349.94,586.5 10349.94,634.76 10336.68,648.02 10319.5,648.02 10299.4,668.13 10299.4,903.94 10565.46,1170 11173.56,1170 11234,1230.44 11234,2871.34 11408.34,2871.34 11429,2892
  Top Layer w20: 11429,2892 C15.1@11429,2928 ; C15.1@11449,2928 11584.63,2928 R21.2@11592.96,2919.67
PC1: C14.1 R19.1 R22.2 U1.9 | length 1472.7
  Top Layer w8: R22.2@9864.67,1456.72 9947.61,1456.72 C14.1@9953.33,1451
  Top Layer w12: R19.1@9773.31,1456.72 R22.2@9864.67,1456.72 ; U1.9@10330.26,586.5 10330.26,531.08 10337.78,523.56 10337.78,513.41 v2(10340.73,510.47)
  Top Layer w20: v2(9895.54,1370) 9895.54,1450 9896.54,1451 C14.1@9953.33,1451
  Bottom Layer w10: v2(9895.54,1370) 9895.54,1098.21 10117.62,876.13 10117.62,686.08 10293.24,510.47 v2(10340.73,510.47)
PC3: R18.1 U1.11 | length 1282.7
  Top Layer w8: U1.11@10290.89,586.5 10290.89,486.56 v2(10300.7,476.74)
  Top Layer w12: R18.1@9644.59,1307 9661.6,1290 v2(9750.93,1290)
  Bottom Layer w10: v2(9750.93,1290) 9750.93,1183.14 10088.89,845.18 10088.89,663.85 10173.54,579.2 10276,476.74 v2(10300.7,476.74)
PC13: R8.1 U1.2 | length 2698.2
  Top Layer w10: v2(10417.33,381.26) 10417.33,482.66 10468.05,533.38 U1.2@10468.05,586.5
  Top Layer w20: v3(12540,617.02) 12540.87,616.15 R8.1@12540.87,412.83
  Bottom Layer w10: v2(10417.33,381.26) 10465.09,429.03 10661.04,429.03 10745.19,513.18 10745.19,580.28 10763.98,599.06 11470.6,599.06 11480.28,589.38 12467,589.38 12480,602.38
  Bottom Layer w20: 12480,603 12525.98,603 v3(12540,617.02)
PC14: C11.2 U1.3 Y2.2 | length 305.8
  Top Layer w10: U1.3@10448.37,586.5 Y2.2@10448.37,684.47 10530.71,766.81 C11.2@10530.71,858.14
PC15: C10.2 U1.4 Y2.1 | length 298.1
  Top Layer w10: U1.4@10428.68,586.5 10428.68,629.36 10410,648.03 10410,719.01 10448.37,757.38 10448.37,851.27 C10.2@10441.5,858.14
PH0: C8.2 U1.5 Y1.2 | length 1432.7
  Top Layer w10: C8.2@11353.7,751.9 C8.2@11361.8,760 ; Y1.2@11353.7,892.61 Y1.2@11357.01,895.92
  Top Layer w12: U1.5@10409,586.5 10408.96,523.37 v2(10415.59,516.74)
  Top Layer w20: C8.2@11353.7,751.9 Y1.2@11353.7,892.61 ; C8.2@11361.8,760 v2(11440,760)
  Bottom Layer w10: v2(10415.59,516.74) 10658.85,760 v2(11440,760)
PH1: C7.2 U1.6 Y1.1 | length 948.4
  Top Layer w6: 10389.31,725.71 v2@10392.98,729.38
  Top Layer w10: U1.6@10389.31,586.5 10389.31,725.71 ; v2(10880,824.9) v2@10884.9,820 ; C7.2@10976.3,746.07 C7.2@10982.99,752.76
  Top Layer w20: v2@10884.9,820 10982.99,820 ; C7.2@10982.99,752.76 10982.99,820 ; Y1.1@10982.99,895.92 10982.99,820
  Bottom Layer w10: v2(10392.98,738.49) 10392.98,762.29 10467.14,836.45 10868.45,836.45 v2(10880,824.9)
RS485-A: R26.2 S3.3 | length 369.9
  Top Layer w6: 13766.41,55.31 R26.2@13766.41,147.46 ; S3.3@13769.83,-38.5 13769.83,51.9
  Top Layer w20: R26.2@13766.41,147.46 13769.83,144.04 S3.3@13769.83,-38.5
RS485-B: R25.2 S3.4 | length 186.3
  Top Layer w20: S3.4@13869.83,-38.5 13869.83,147.71 R25.2@13869.93,147.81
RST-RF: U1.30 U2.10 | length 1043.8
  Top Layer w10: U2.10@9845.89,966.26 9915.34,966.26 10000.7,880.9 v3(10000.7,540.28) ; U1.30@10113.73,251.86 10175.19,251.86 10219.49,296.16 v2(10219.49,408.14) v2@10220.7,409.34
  Bottom Layer w20: v3(10000.7,540.28) 10007.03,540.28 10139.18,408.14 v2(10219.49,408.14) v2@10220.7,409.34
SCLK: U1.21 U2.13 | length 1048
  Top Layer w6: U1.21@10113.73,429.03 U1.21@10114.5,429.8 ; v2@10180.84,429.8 10184.39,433.36 v2(10184.39,439.95)
  Top Layer w10: U1.21@10114.5,429.8 v2@10180.84,429.8
  Top Layer w20: U2.13@9645,1087.82 9645,999 v3(9654,990)
  Bottom Layer w6: 10168.44,439.95 v2(10184.39,439.95)
  Bottom Layer w10: v3(9654,990) 9760.94,990 9992.77,758.18 9992.77,599.06 10151.88,439.95 v2(10184.39,439.95)
SWDIO: ISP1.4 U1.46 | length 226.2
  Top Layer w6: ISP1.4@10556.36,-10 ISP1.4@10556.36,4.13
  Top Layer w12: U1.46@10448.37,133.76 10448.37,64.74 10476.37,36.74 10540.78,36.74 10556.36,21.16 ISP1.4@10556.36,4.13
TX-YJP: RJX1.1 U1.58 | length 5169.5
  Top Layer w10: U1.58@10566.47,389.66 10740,389.66 v2(10800.34,450)
  Top Layer w20: RJX1.1@13924.08,1849.94 v3(13972,1802.02)
  Bottom Layer w10: v2(10800.34,450) 10800.34,460 10827.15,486.81 10961.92,486.81 10972.97,497.86 ; 10972.27,498.57 11003.03,529.33 11453.56,529.33 11458.5,524.38 13350.17,524.38 13555.79,730 13853.66,730 13921.52,797.85 13921.52,959.02 13972.5,1010 14260,1010 14310,1060 14310,1190
  Bottom Layer w20: v3(13972,1802.02) 14006.6,1802.02 14096.5,1712.12 14096.5,1278.08 14126.58,1248 14252,1248 14310,1190
USART1_RX: S1.3 U1.59 | length 3214.1
  Top Layer w10: U1.59@10566.47,409.34 10699.34,409.34 v2(10820,530)
  Top Layer w20: v2(13030,436.87) v2(13030,557.59) ; v3(13154.71,55.31) 13154.71,-32.46 S1.3@13160.75,-38.5
  Bottom Layer w10: v2(10820,530) 10842.33,552.33 11457.94,552.33 11462.89,547.38 13019.79,547.38 v2(13030,557.59)
  Bottom Layer w20: v2(13030,436.87) 13030,120.65 13095.33,55.31 v3(13154.71,55.31)
USART2_RX: DaYin1.2 S1.6 U1.17 U6.1 | length 6530
  Top Layer w6: U1.17@10113.73,507.77 U1.17@10118.7,507.77 ; v2@10145.13,707.9 v2(10152.56,707.9)
  Top Layer w10: U1.17@10118.7,507.77 10105.7,520.77 10105.7,580.72 v3(10088.89,597.53) 10088.89,651.67 v2@10145.13,707.9
  Top Layer w20: v2(13362.73,836.45) 13464.37,836.45 ; S1.6@13460.75,-38.5 13460.75,100.65 13515.24,155.14 13515.24,470.55 13456.81,528.98 13456.81,830.58 13458.49,830.58 13464.37,836.45 ; U6.1@13886.31,779.06 13886.31,848.41 13844.73,890 13660.85,890 13607.31,836.45 13464.37,836.45
  Bottom Layer w10: DaYin1.2@9268.6,1590.8 9403.24,1590.8 9726.12,1267.92 9726.12,1134.99 10061.52,799.59 10061.52,665.76 10088.89,638.39 v3(10088.89,597.53) ; v2(10152.56,707.9) 10291.26,707.9 10466.22,882.87 10851.73,882.87 10867.95,866.65 11454.55,866.65 11466.48,878.57 11701.43,878.57 11743.55,836.45 v2(13362.73,836.45)
USART2_TX: DaYin1.3 U1.16 U6.4 | length 5423.4
  Top Layer w6: U1.16@10192.46,578.27 U1.16@10192.46,586.5
  Top Layer w12: v2(10150.23,556.74) 10170.92,556.74 U1.16@10192.46,578.27
  Top Layer w20: v3(13710,837.24) 13736.31,810.93 U6.4@13736.31,779.06
  Bottom Layer w10: DaYin1.3@9268.6,1490.8 9463.51,1490.8 9700,1254.31 9700,1105.09 10035.44,769.65 10035.44,600.44 10079.13,556.74 v2(10150.23,556.74) 10165.14,556.74 10274.17,447.72 10351.67,447.72 10374.37,470.41 10374.37,519.84 10641.36,786.82 11149.96,786.82 11174.08,810.95 11424.31,810.95 11473.93,860.57 11668.18,860.57 11717.11,811.64 13309.98,811.64 13314.98,806.64 13402.86,806.64 13433.46,837.24 v3(13710,837.24)
WR/CSL/SWCLK: ISP1.3 U1.49 | length 515.5
  Top Layer w6: ISP1.3@10456.36,4.32 10459.6,1.09 ISP1.3@10459.6,-10
  Top Layer w10: U1.49@10566.47,212.49 10566.47,79.8 10606.27,40
  Top Layer w12: 10606.27,-48.81 10606.27,40
  Top Layer w20: ISP1.3@10456.36,-10 10456.36,-49.7 10486.66,-80 10587,-80 10606.27,-60.73 10606.27,-48.81
pads on no net: JX2.0 LY1.1 LY1.3 LY1.4 LY1.7 LY1.12 LY1.13 LY1.15 LY1.17 LY1.18 S2.3 U1.10 U1.33 U1.45 U2.2@9495,639.98 U2.7@9620,863.9 U2.9 U3.3 U3.8 U3.9 U3.10 U3.11 U3.12 U3.15

## Polygon pours and split planes (outlines as drawn)
GND on Top Layer "GND_L01_P003" (solid, remove dead copper, pour order 3): 9167.08,3158 9172.02,-280.86 14493.57,-280.86 14497.63,3162
GND on Bottom Layer "GND_L02_P001" (solid, remove dead copper, pour order 1): 9160.06,3146.92 9164.98,-278.75 14498.08,-278.75 14502.14,3150.94

## Keep-outs
Keep-Out Layer:
  lines w8: 9185.03,3130.72 9185.03,3119.88 9185.03,-263.71 14500,-263.71 14500,3130.3 9185.44,3130.3

## Other copper
Top Layer:
  rectangle net 3V3: 10913.37,666.72 10982.99,689.28
  pour cut-out: 10930.9,3116.06 10932.25,3114.71 10932.25,3038.28 10891.9,3038.28 10891.9,3123.06
  pour cut-out: 10634.73,3003.1 10639.68,2998.16 10639.68,2925.66 10737.17,2925.66 10785.63,2974.11 10785.63,2989.17 10639.77,2989.17 10639.68,2989.26
  pour cut-out: 10636.36,3126.53 10641.3,3121.58 10641.3,3049.09 10738.8,3049.09 10787.25,3097.54 10787.25,3112.6 10641.39,3112.6 10641.3,3112.69
  pour cut-out: 10634.26,2909.87 10639.2,2904.92 10639.2,2832.43 10736.7,2832.43 10785.15,2880.88 10785.15,2895.94 10639.29,2895.94 10639.2,2896.03
Multi-Layer:
  pour cut-out: 10177.54,989.89 cw(c10177.54,1189.89) 9977.54,1189.89 cw(c10177.54,1189.89) 10177.54,1389.89 cw(c10177.54,1189.89) 10377.54,1189.89 cw(c10177.54,1189.89)
  pour cut-out: 10177.54,2485.95 cw(c10177.54,2685.95) 9977.54,2685.95 cw(c10177.54,2685.95) 10177.54,2885.95 cw(c10177.54,2685.95) 10377.54,2685.95 cw(c10177.54,2685.95)
  pour cut-out: 13445.26,989.89 cw(c13445.26,1189.89) 13245.26,1189.89 cw(c13445.26,1189.89) 13445.26,1389.89 cw(c13445.26,1189.89) 13645.26,1189.89 cw(c13445.26,1189.89)
  pour cut-out: 13445.26,2485.95 cw(c13445.26,2685.95) 13245.26,2685.95 cw(c13445.26,2685.95) 13445.26,2885.95 cw(c13445.26,2685.95) 13645.26,2685.95 cw(c13445.26,2685.95)
  pour cut-out: 10684.56,132.11 11696.43,130.19 11696.43,-263.1 10684.56,-263.1

## Silkscreen, mask and mechanical layers (free items; w line width, h text height)
Top Overlay:
  circle w10: c14277.92,2912.49 r137.91
  circle w10: c14277.92,-40.26 r139.74
  circle w10: c9553.51,-40.26 r139.79
  circle w10: c9553.51,2912.49 r137.9
  circle w10: c10177.78,1189.89 r121.68
  circle w10: c13445.5,1189.89 r125.72
  circle w10: c13445.5,2685.95 r128.25
  circle w10: c10177.78,2685.95 r125.76
  rectangle: 9410,698.2 9794.92,1042.6
  text "SWKA-2025.1201" at 13313.11,3000.32 h100
  text "-" at 10275.54,2936.7 h50
  text "+" at 10438.5,2899.48 h100
  text "-" at 10410,2841.89 h50
  text "+" at 10797.88,2824.89 h100
  text "3.3V" at 13771.92,1735.76 h59.06
  text "3V3" at 9330,1670.71 h59.06
  text "RX" at 9340,1578.72 h59.06
  text "TX" at 9340.45,1470.36 h59.06
  text "GND" at 9318.6,1375.37 h59.06
  text "SET" at 12019.13,505.26 h60
  text "RX1" at 13116.98,71.63 h60
  text "T1-3.3" at 12978.2,69.97 h50 r90
  text "RX2" at 13398.6,68.07 h60
  text "GND" at 13078.02,57.41 h60 r90
  text "GND" at 13390.03,57.41 h60 r90
  text "K1" at 12542.21,55.56 h60
  text "K2" at 12640,55.56 h60
  text "GND" at 13683.87,54.5 h60 r90
  text "T2-3.3" at 13215.51,51.87 h50
  text "GND" at 12710,43.42 h60
  text "A" at 13725.79,43.42 h60
  text "B" at 13827.27,43.42 h60
  text "485-V" at 13580,25.14 h60 r90
  text "-" at 12270,-111.1 h60
  text "+" at 11810,-120 h60
  text "GND" at 10378.14,-187.33 h60 r90
  text "3.3V" at 10271.99,-190.44 h60 r90
  text "CLK" at 10469.23,-190.44 h60 r90
  text "NRST" at 10678.88,-210.81 h60 r90
  text "RST" at 9977.47,-240 h60
  text "SWDIO" at 10574.76,-250 h60 r90
Top Solder:
  rectangle: 10913.37,664.82 10982.99,695.18
  rectangle: 10931.41,671.81 10972.27,691.68

## Text inside footprints (layer, text, board x,y; h text height)
CE3: Top Overlay "+" at 9847.15,466.74 h60 r180
JX2: Top Overlay "BUSY" at 13459.55,1593.34 h40; Top Overlay "VCC" at 13469.55,1688.34 h40; Top Overlay "RX" at 13600.04,1840 h40; Top Overlay "TX" at 13600.04,1940.13 h40; Top Overlay "液晶屏-2.8" at 11150,1890 h300; Top Overlay "GND" at 13445.5,2093.34 h60